# Altium PCB MainBoardPCB_PWR.PcbDoc (part 27 of 29)
Units mm, origin at the board's own origin, x right, y up, seen from the top; angles counter-clockwise.
Board outline 333.63 x 349.38 mm, 16 copper layers (L1, L2 (GND), L3 (Sign), L4 (GND), L5 (Sign), L6 (PWR/GND), L7(PWR/GND), L8 (PWR/GND), L9 (PWR/GND), L10 (PWR/GND), L11 (PWR/GND), L12 (Sign), L13 (GND), L14 (Sign), L15 (GND), L16), stack 2.503 mm thick; 2187 components, 1615 nets, 7987 pads, 1695 vias.
Unrouted connection lines stored in the file: 4757.
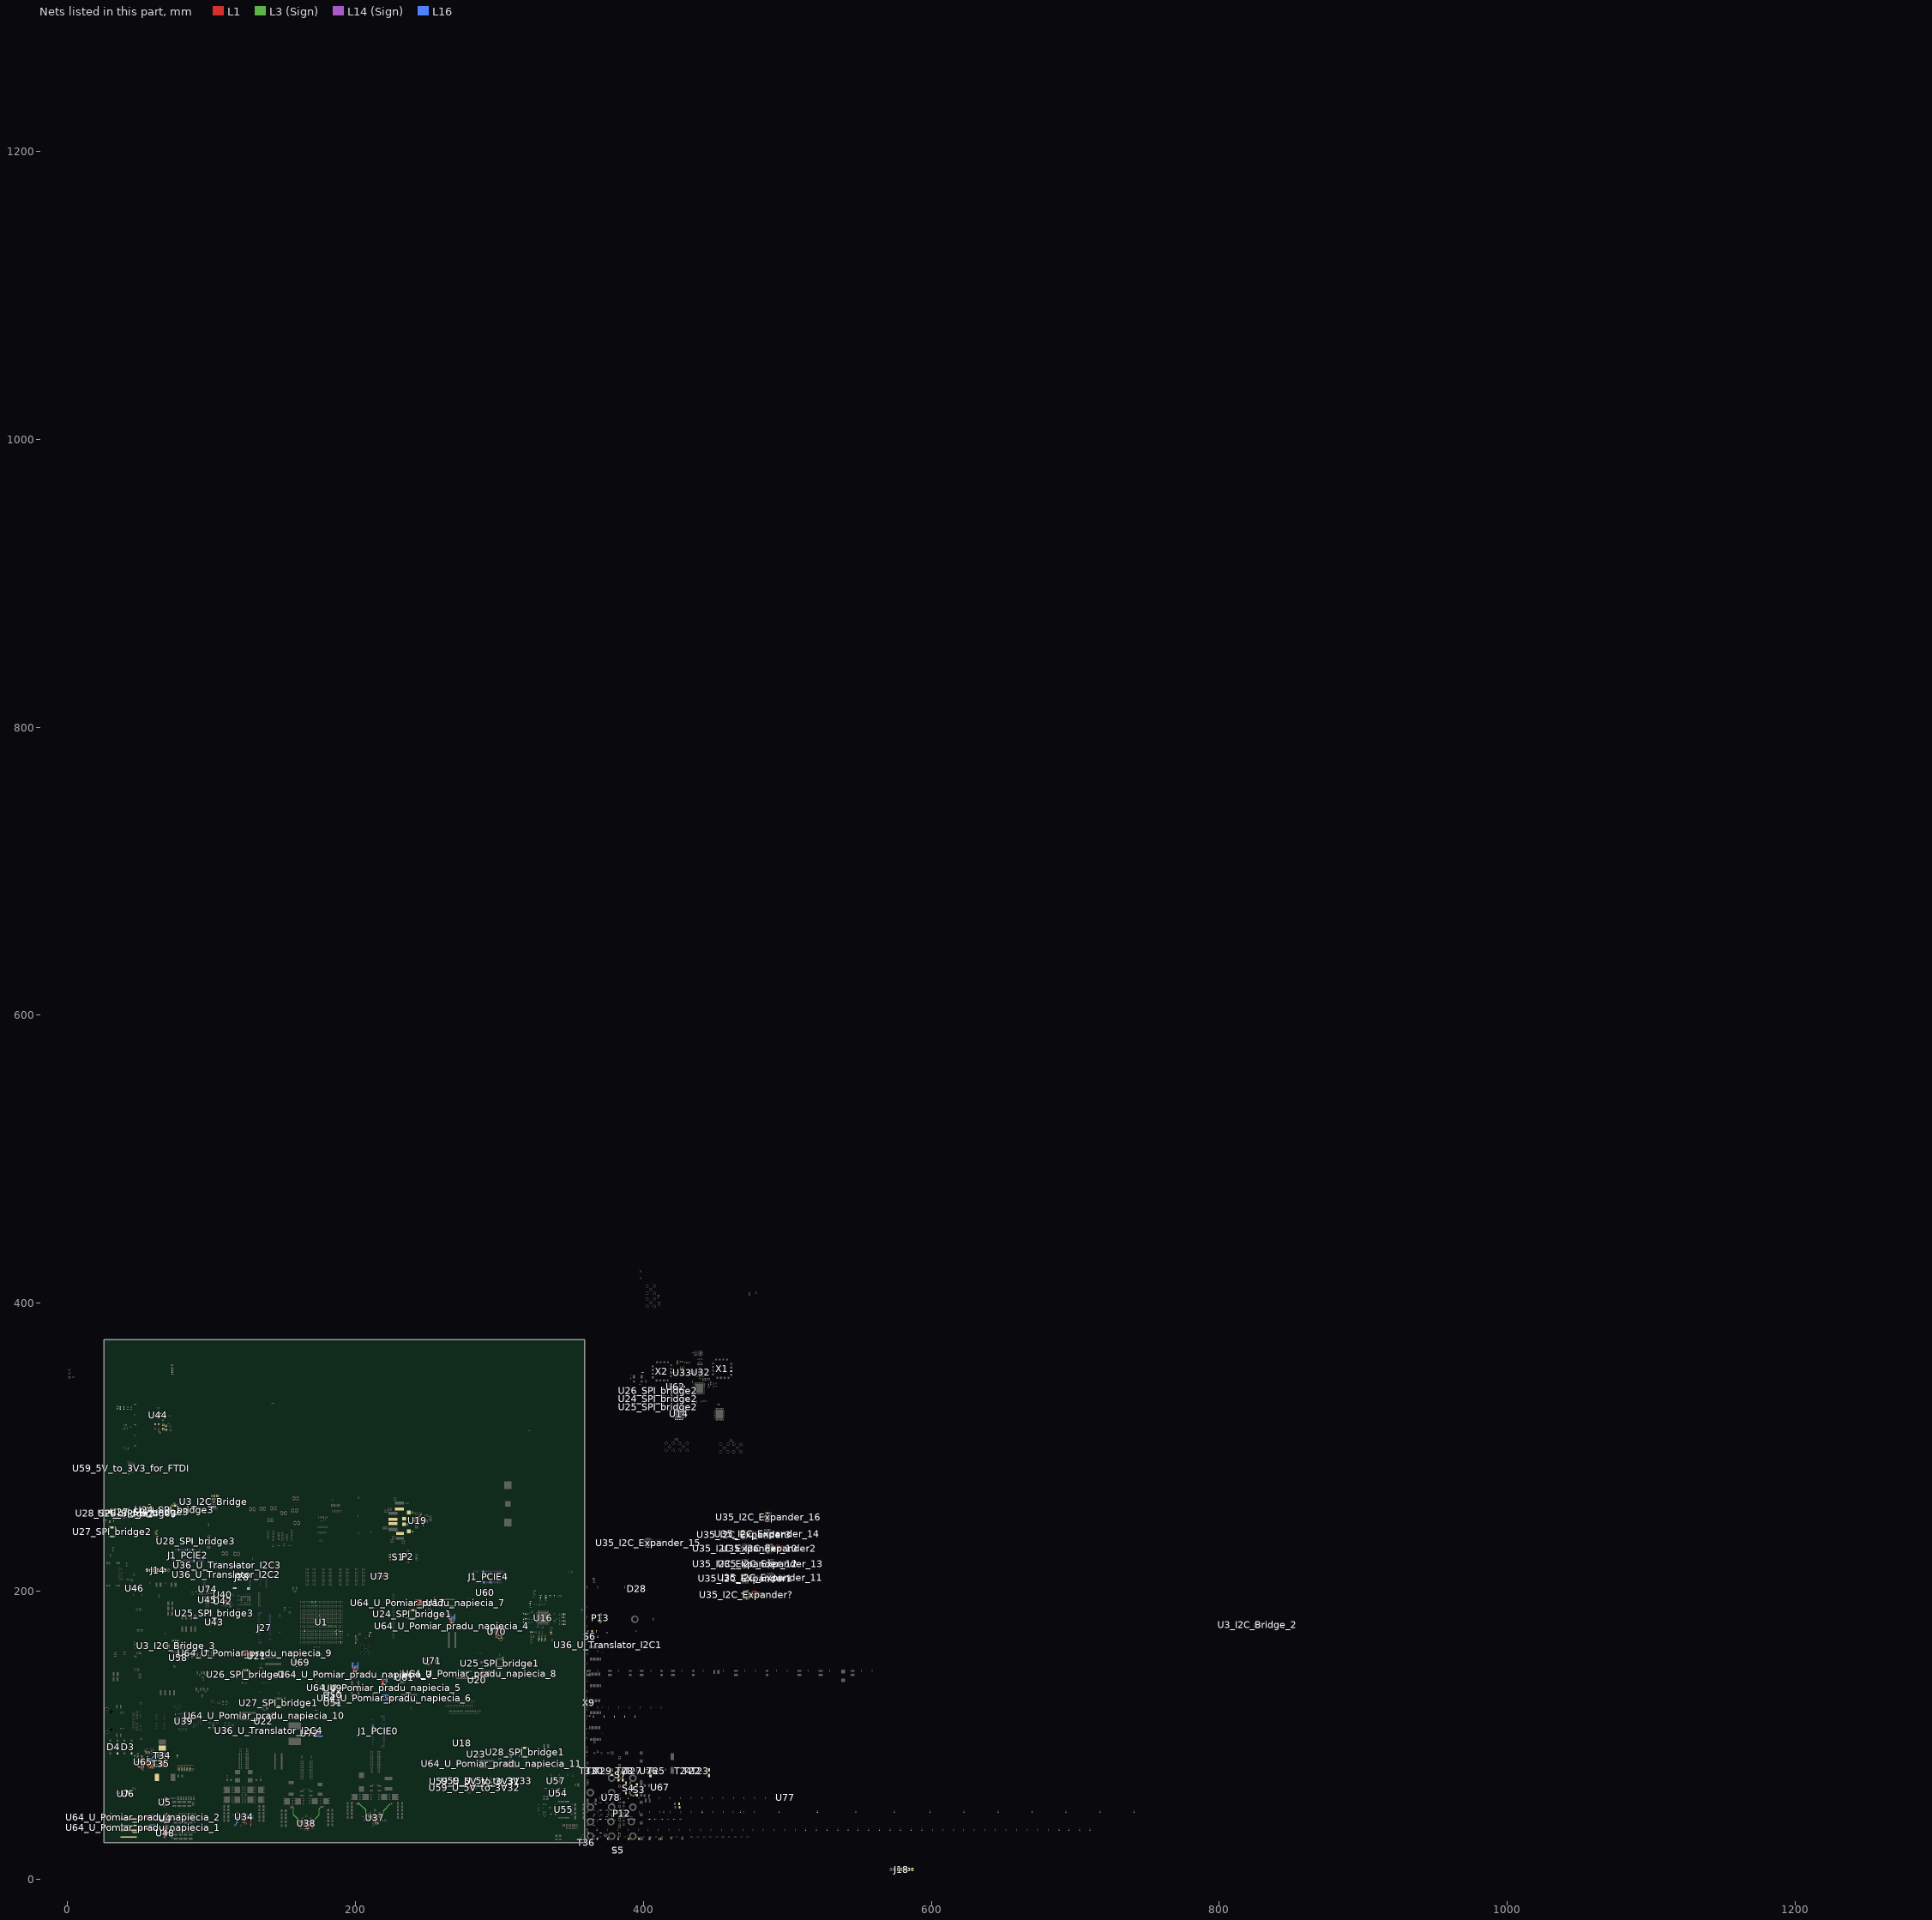
[diagram p22: the nets of this part, all layers, seen from the top]

## Via types
v1: diameter 0.5, hole 0.2, L1 to L16, 786 vias
v2: diameter 0.5/0.35/0.35/0.35/0.35/0.35/0.35/0.35/0.35/0.35/0.35/0.35/0.35/0.35/0.35/0.5 (per signal layer), hole 0.15, L1 to L16, tented both sides, 164 vias
v3: diameter 2.54, hole 1.02, L1 to L16, 152 vias
v4: diameter 0.5/0.35/0.35/0.35/0.35/0.35/0.35/0.35/0.35/0.35/0.35/0.35/0.35/0.35/0.35/0.5 (per signal layer), hole 0.2, L1 to L16, tented both sides, 100 vias
v5: diameter 0.45, hole 0.15, L1 to L16, 79 vias
v6: diameter 0.35/0/0.35 (per signal layer), hole 0.127, L1 to L3 (Sign), tented both sides, 78 vias
v7: diameter 0.45/0.45/0.45/0.45/0.45/0.45/0.45/0.45/0.45/0.45/0.45/0.45/0.45/0.45/0.45/0.45 (per signal layer), hole 0.15, L1 to L16, 65 vias
v8: diameter 0.4, hole 0.15, L1 to L16, 61 vias
v9: diameter 0.2, hole 0.1, L1 to L16, 35 vias
v10: diameter 0.5, hole 0.2, L1 to L16, tented both sides, 32 vias
v11: diameter 0.2/0/0.2 (per signal layer), hole 0.1, L1 to L3 (Sign), 28 vias
v12: diameter 0.4, hole 0.2, L1 to L16, 16 vias
v13: diameter 0.25, hole 0.2, L1 to L16, 16 vias
v14: diameter 0.3, hole 0.2, L1 to L16, 15 vias
v15: diameter 0.5/0.35/0.35/0.35/0.35/0.35/0.35/0.35/0.35/0.35/0.35/0.35/0.35/0.35/0.35/0.45 (per signal layer), hole 0.15, L1 to L16, tented both sides, 10 vias
v16: diameter 5, hole 3, L1 to L16, 9 vias
v17: diameter 0.2/0/0.2 (per signal layer), hole 0.1, L1 to L3 (Sign), tented both sides, 9 vias
v18: diameter 0.35/0/0.35 (per signal layer), hole 0.127, L1 to L3 (Sign), 7 vias
v19: diameter 0.35/0/0.35 (per signal layer), hole 0.127, L14 (Sign) to L16, tented both sides, 5 vias
v20: diameter 1.65, hole 1.65, L1 to L16, 4 vias
v21: diameter 1.15, hole 1.15, L1 to L16, 4 vias
v22: diameter 0.35, hole 0.127, L1 to L2 (GND), 2 vias
v23: diameter 0.4, hole 0.2, L1 to L16, tented both sides, 2 vias
v24: diameter 0.35, hole 0.127, L1 to L2 (GND), tented both sides, 2 vias
v25: diameter 0.508, hole 0.127, L1 to L2 (GND), 2 vias
v26: diameter 0.508, hole 0.127, L2 (GND) to L3 (Sign), 2 vias
v27: diameter 0.35, hole 0.127, L3 (Sign) to L6 (PWR/GND), tented both sides, 2 vias
v28: diameter 0.5, hole 0.2, L3 (Sign) to L6 (PWR/GND), tented both sides, 2 vias
v29: diameter 5.5, hole 3.5, L1 to L16, 1 vias
v30: diameter 0.45/0.45/0.45 (per signal layer), hole 0.15, L1 to L3 (Sign), 1 vias
v31: diameter 0.35/0.35/0.35 (per signal layer), hole 0.127, L1 to L3 (Sign), tented both sides, 1 vias
v32: diameter 0.45/0/0.45 (per signal layer), hole 0.15, L1 to L3 (Sign), tented both sides, 1 vias
v33: diameter 0.45/0/0.45 (per signal layer), hole 0.2, L14 (Sign) to L16, tented both sides, 1 vias
v34: diameter 0.35, hole 0.127, L2 (GND) to L3 (Sign), 1 vias

## Nets (pads, with @x,y where several pads share a name; then routed paths per layer and width w, separated by ;. In a path a pad name is that pad's centre, name@x,y a point inside that pad or via, vN(x,y) a via of type N, cw(c..) or ccw(c..) an arc to the next point about the centre after c; other vN are vias at no path point) (continued)
NetC657_1: C657.1 U51.6 | length 1.4
  L1 w0.254: U51.6@185.559,122.213 186.674,122.213 186.721,122.166 186.726,122.166 186.869,122.023 C657.1@186.869,122.018
NetC674_2: C674.2 FB45.1 R644.2 U69.10 U69.11 U69.12 U69.13 U69.14
NetC678_2: C678.2 R652.2 R654.2 T25.1 T29.3
NetC679_2: C679.2 D22.1 D23.1
NetC680_2: C680.2 R656.1 R657.1 T30.1
NetC693_1: C693.1 L22.1 T34.1 T34.2 T34.3 T35.5 U65.12 | length 8
  L1 w0.254: U65.12@54.172,80.707 55.15,80.707 55.518,80.339 55.518,78.52 56.907,77.13 C693.1@59.589,77.13
NetC693_2: C693.2 D26.1 R665.1 | length 2.8
  L1 w0.254: R665.1@58.578,77.884 58.591,77.897 59.576,77.897 C693.2@59.589,77.91 59.589,77.915 59.978,78.305 D26.1@59.978,79.555
NetC701_1: C701.1 R667.2 | length 1
  L1 w0.254: C701.1@49.964,77.884 49.966,77.882 R667.2@50.946,77.88 R667.2@50.946,77.88
NetC701_2: C701.2 C702.2 U65.5 | length 3.5
  L1 w0.254: C701.2@49.184,77.884 49.117,77.952 49.117,79.353 C702.2@49.049,79.42 49.054,79.42 49.197,79.563 49.197,79.568 49.233,79.604 49.233,79.82 49.619,80.207 U65.5@50.492,80.207
NetC703_2: C703.2 U65.7 | length 2.1
  L1 w0.254: U65.7@51.832,79.367 51.855,79.344 51.855,78.898 52.211,78.541 52.522,78.541 52.778,78.285 C703.2@52.778,77.832
NetC706_1: C706.1 R671.1 R672.2 U70.16 | length 3.4
  L1 w0.254: U70.16@299.259,173.698 R672.2@299.259,174.82 299.737,174.82 300.076,174.481 300.335,174.481 300.793,174.938 C706.1@300.793,175.397
NetC710_1: C710.1 R673.1 R674.2 U70.10 | length 5.3
  L1 w0.254: v11(299.253,169.141) 299.259,169.147 U70.10@299.259,169.748 ; v11(301.668,168.891) 301.618,168.891 301.445,168.718 301.445,168.532 301.313,168.4 C710.1@301.313,168.063 301.313,167.527 301.702,167.138 R674.2@301.752,167.138
  L3 (Sign) w0.254: v11(299.253,169.141) 301.417,169.141 v11(301.668,168.891)
NetC711_2: C711.2 U70.7 | length 1.6
  L1 w0.254: C711.2@297.752,168.193 297.756,168.196 297.756,169.745 U70.7@297.759,169.748
NetC712_2: C712.2 U70.19 | length 1.1
  L1 w0.254: C712.2@297.752,174.79 297.756,174.786 297.756,173.702 U70.19@297.759,173.698
NetC713_2: C713.2 U71.3 X1.14 | length 2.5
  L1 w0.254: 249.223,142.723 249.228,142.723 250.076,143.57 250.076,144.878
NetC719_2: C719.2 U69.7 | length 0.9
  L1 w0.254: U69.7@161.393,152.137 161.393,152.615 161.458,152.68 C719.2@161.458,153.027
NetC724_1: C724.1 R384.1
NetC725_1: C725.1 R385.1
NetC726_1: C726.1 R484.1
NetC727_1: C727.1 R485.1
NetC790_1: C790.1 U76.3
NetD5_1: D5.1 R716.1
NetD5_2: D5.2 U43.14
NetD6_1: D6.1 R717.1
NetD6_2: D6.2 U43.13
NetD7_1: D7.1 R718.1
NetD7_2: D7.2 D9.2 U43.12
NetD8_1: D8.1 R719.1
NetD8_2: D8.2 U43.11
NetD9_1: D9.1 R720.1
NetD10_1: D10.1 R368.1
NetD10_2: D10.2 U44.12
NetD11_2: D11.2 R370.1 S4.1 S4.2 U44.7
NetD12_2: D12.2 R369.1 S3.1 S3.2 U44.6
NetD16_1: D16.1 L13.1 U19.5
NetD16_2: D16.2 U19.6
NetD17_1: D17.1 L16.1 U19.4
NetD17_2: D17.2 U19.3
NetD18_1: D18.1 L17.1 U19.2
NetD18_2: D18.2 U19.1
NetD19_1: D19.1 L18.1 U19.7
NetD19_2: D19.2 U19.8
NetD20_1: D20.1 D21.1 R647.1
NetD20_2: D20.2 T23.3
NetD21_2: D21.2 T27.3
NetD28_2: D28.2 R276.2
NetFB29_2: FB29.2 J28.10 J28.11 J28.12 J28.13
NetJ30_1: R283.2
NetJ30_2: R286.2
NetL15_2: L15.2 U19.24 | length 3.1
  L1 w0.254: U19.24@243.724,251.458 243.724,251.925 243.873,252.074 244.901,252.074 245.449,252.622 L15.2@245.449,253.225
NetP3_1: P3.1 U44.11
NetP4_2: P4.2 U44.10
NetP12_13: P12.13 R730.1 U78.1
NetP13_1: P13.1 R675.2
NetP13_3: P13.3 R737.1
NetR3_I2C_Bridge_1: R3_I2C_Bridge.1 U3_I2C_Bridge.17
NetR3_I2C_Bridge_2_1: R3_I2C_Bridge_2.1 U3_I2C_Bridge_2.17
NetR3_I2C_Bridge_3_1: R3_I2C_Bridge_3.1 R176.1 R180.1 R185.1 R189.1 R194.1 R198.1 R203.1 R207.1 R213.1 R221.1 R538.1 U3_I2C_Bridge.19 U3_I2C_Bridge_3.17 U58.13 U64_U_Pomiar_pradu_napiecia_7.5 U64_U_Pomiar_pradu_napiecia_8.5 U64_U_Pomiar_pradu_napiecia_9.5 U64_U_Pomiar_pradu_napiecia_10.5 U64_U_Pomiar_pradu_napiecia_11.5 | length 23.6
  L1 w0.254: v8(124.91,156.531) R198.1@124.91,157.663 ; v8(126.79,155.981) 126.83,155.981 126.887,156.039 U64_U_Pomiar_pradu_napiecia_9.5@127.94,156.039 ; U64_U_Pomiar_pradu_napiecia_10.5@138.938,114.546 v8(140.288,114.546) ; R207.1@142.088,113.018 v8(142.088,114.152) ; v8(245.03,191.282) R180.1@245.03,192.759 ; v8(246.769,190.832) 246.771,190.831 U64_U_Pomiar_pradu_napiecia_7.5@248.09,190.829 U64_U_Pomiar_pradu_napiecia_7.5@248.09,190.829 ; U64_U_Pomiar_pradu_napiecia_8.5@288.331,143.579 v8(289.281,143.579) ; R189.1@291.357,141.943 R185.1@291.357,143.229 v8(291.357,143.379) ; U64_U_Pomiar_pradu_napiecia_11.5@303.702,80.993 v8(304.965,80.993) ; R221.1@307.166,78.891 v8(307.166,80.768)
  L16 w0.254: v8(124.91,156.531) 125.46,155.981 v8(126.79,155.981) ; v8(140.288,114.546) 141.694,114.546 v8(142.088,114.152) ; v8(245.03,191.282) 245.48,190.832 v8(246.769,190.832) ; v8(289.281,143.579) 289.481,143.379 v8(291.357,143.379) ; v8(304.965,80.993) 305.005,80.993 305.23,80.768 v8(307.166,80.768)
NetR4_I2C_Bridge_1: R4_I2C_Bridge.1 U3_I2C_Bridge.16
NetR4_I2C_Bridge_2_1: R4_I2C_Bridge_2.1 U3_I2C_Bridge_2.16
NetR4_I2C_Bridge_3_1: R4_I2C_Bridge_3.1 R177.1 R181.1 R186.1 R190.1 R195.1 R199.1 R204.1 R208.1 R215.1 R222.1 R427.1 U3_I2C_Bridge.20 U3_I2C_Bridge_3.16 U58.14 U64_U_Pomiar_pradu_napiecia_7.4 U64_U_Pomiar_pradu_napiecia_8.4 U64_U_Pomiar_pradu_napiecia_9.4 U64_U_Pomiar_pradu_napiecia_10.4 U64_U_Pomiar_pradu_napiecia_11.4 | length 30.3
  L1 w0.254: R195.1@123.852,156.531 v8(123.852,157.663) ; v8(126.79,156.656) 126.83,156.656 126.947,156.539 U64_U_Pomiar_pradu_napiecia_9.4@127.94,156.539 ; U64_U_Pomiar_pradu_napiecia_10.4@138.938,114.046 v8(139.888,114.046) ; R208.1@143.053,113.018 v8(143.053,113.143) R204.1@143.053,114.282 ; R177.1@244.014,191.282 v8(244.014,192.709) R181.1@244.014,192.759 ; v8(246.769,191.479) 246.809,191.479 246.959,191.329 U64_U_Pomiar_pradu_napiecia_7.4@248.09,191.329 ; U64_U_Pomiar_pradu_napiecia_8.4@288.331,143.079 288.354,143.056 289.114,143.056 289.241,142.929 v8(289.281,142.929) ; v8(292.357,142.068) R186.1@292.357,143.229 ; U64_U_Pomiar_pradu_napiecia_11.4@303.702,80.493 304.671,80.493 304.821,80.343 v8(304.86,80.343) ; R222.1@308.227,78.891 R215.1@308.227,80.768
  L16 w0.254: v8(123.852,157.663) 125.783,157.663 v8(126.79,156.656) ; v8(139.888,114.046) 140.791,113.143 v8(143.053,113.143) ; v8(244.014,192.709) 245.539,192.709 v8(246.769,191.479) ; v8(289.281,142.929) 290.142,142.068 v8(292.357,142.068) ; v8(304.86,80.343) 306.462,78.741 v8(308.227,78.741)
NetR5_I2C_Bridge_1: R5_I2C_Bridge.1 U3_I2C_Bridge.15
NetR5_I2C_Bridge_2_1: R5_I2C_Bridge_2.1 U3_I2C_Bridge_2.15
NetR5_I2C_Bridge_3_1: R5_I2C_Bridge_3.1 U3_I2C_Bridge_3.15 U35_I2C_Expander3.8
NetR6_I2C_Bridge_1: R6_I2C_Bridge.1 U3_I2C_Bridge.14
NetR6_I2C_Bridge_2_1: R6_I2C_Bridge_2.1 U3_I2C_Bridge_2.14
NetR6_I2C_Bridge_3_1: R6_I2C_Bridge_3.1 U3_I2C_Bridge_3.14 U35_I2C_Expander3.9
NetR7_I2C_Bridge_1: R7_I2C_Bridge.1 U3_I2C_Bridge.13
NetR7_I2C_Bridge_2_1: R7_I2C_Bridge_2.1 U3_I2C_Bridge_2.13
NetR7_I2C_Bridge_3_1: R7_I2C_Bridge_3.1 R130.1 U3_I2C_Bridge_3.13
NetR8_I2C_Bridge_1: R8_I2C_Bridge.1 U3_I2C_Bridge.12
NetR8_I2C_Bridge_2_1: R8_I2C_Bridge_2.1 U3_I2C_Bridge_2.12
NetR8_I2C_Bridge_3_1: R8_I2C_Bridge_3.1 R131.1 U3_I2C_Bridge_3.12
NetR9_I2C_Bridge_2_1: R9_I2C_Bridge_2.1 U3_I2C_Bridge_2.11
NetR9_I2C_Bridge_3_1: R9_I2C_Bridge_3.1 R22.1 R389.1 R457.1 R465.1 R563.1 R567.1 R571.1 R575.1 R579.1 R583.1 R587.1 R591.1 R593.1 R597.1 U3_I2C_Bridge_3.11 U35_I2C_Expander1.8 U35_I2C_Expander2.8 U64_U_Pomiar_pradu_napiecia_1.5 U64_U_Pomiar_pradu_napiecia_2.5 U64_U_Pomiar_pradu_napiecia_3.5 U64_U_Pomiar_pradu_napiecia_4.5 U64_U_Pomiar_pradu_napiecia_5.5 U64_U_Pomiar_pradu_napiecia_6.5 U72.5 | length 39.6
  L1 w0.164: U64_U_Pomiar_pradu_napiecia_5.5@218.753,135.604 218.753,138.01 219.352,138.609 v4(219.352,138.865)
  L1 w0.254: U64_U_Pomiar_pradu_napiecia_1.5@54.676,36.768 58.159,36.768 58.299,36.628 v8(58.339,36.628) ; U64_U_Pomiar_pradu_napiecia_2.5@54.676,43.783 58.174,43.783 58.299,43.658 v8(58.339,43.658) ; U72.5@170.431,102.245 174.133,102.245 v8(174.687,101.691) ; U64_U_Pomiar_pradu_napiecia_3.5@198.796,144.262 198.796,147.009 199.036,147.249 v8@199.036,148.149 ; v8(220.909,125.43) 221.634,124.705 U64_U_Pomiar_pradu_napiecia_6.5@224.78,124.705 ; U64_U_Pomiar_pradu_napiecia_4.5@266.005,178.019 266.005,180.621 266.43,181.046 v8(266.43,181.846)
  L16 w0.254: R465.1@58.339,35.163 v8(58.339,36.628) ; R597.1@58.339,41.9 v8(58.339,43.658) ; R389.1@174.687,100.145 v8(174.687,101.691) ; R563.1@199.036,148.149 R567.1@200.961,148.149 ; R579.1@219.302,138.865 v4(219.352,138.865) R583.1@221.209,138.865 ; R587.1@220.909,125.305 v8(220.909,125.43) R591.1@220.909,126.878 ; R571.1@266.305,181.846 v8(266.43,181.846) R575.1@268.155,181.846
  other v8: 198.919,148.246
NetR10_I2C_Bridge_2_1: R10_I2C_Bridge_2.1 U3_I2C_Bridge_2.10
NetR10_I2C_Bridge_3_1: R10_I2C_Bridge_3.1 R24.1 R390.1 R459.1 R466.1 R564.1 R568.1 R572.1 R576.1 R580.1 R584.1 R588.1 R592.1 R594.1 R598.1 U3_I2C_Bridge_3.10 U35_I2C_Expander1.9 U35_I2C_Expander2.9 U64_U_Pomiar_pradu_napiecia_1.4 U64_U_Pomiar_pradu_napiecia_2.4 U64_U_Pomiar_pradu_napiecia_3.4 U64_U_Pomiar_pradu_napiecia_4.4 U64_U_Pomiar_pradu_napiecia_5.4 U64_U_Pomiar_pradu_napiecia_6.4 U72.4 | length 37.1
  L1 w0.164: U64_U_Pomiar_pradu_napiecia_5.4@219.253,135.17 219.253,136.543 219.253,136.977 219.935,137.658 v4(221.147,137.658)
  L1 w0.254: U64_U_Pomiar_pradu_napiecia_1.4@54.676,36.267 56.193,36.267 v8(57.298,35.163) ; U64_U_Pomiar_pradu_napiecia_2.4@54.676,43.283 55.881,43.283 v8(57.264,41.9) ; U72.4@170.431,101.745 172.074,101.745 v8(173.68,100.139) ; U64_U_Pomiar_pradu_napiecia_3.4@199.296,144.262 199.296,145.539 200.961,147.204 v8(200.961,147.226) ; v8(221.959,126.883) 223.637,125.205 U64_U_Pomiar_pradu_napiecia_6.4@224.78,125.205 ; U64_U_Pomiar_pradu_napiecia_4.4@266.505,178.019 266.505,179.256 v8(268.151,180.903)
  L16 w0.254: v8(57.264,41.9) R594.1@57.264,43.654 ; v8(57.298,35.163) R459.1@57.298,36.628 ; v8(173.68,100.139) R24.1@173.68,101.691 ; R564.1@198.911,147.2 198.937,147.226 v8(200.961,147.226) R568.1@200.961,147.2 ; R580.1@219.302,137.658 v4(221.147,137.658) R584.1@221.197,137.658 ; R588.1@221.959,125.305 v8(221.959,126.883) ; R572.1@266.305,180.907 266.309,180.903 v8(268.151,180.903) R576.1@268.155,180.907
NetR12_1: R12.1 R19.2 U5.5 | length 2
  L1 w0.254: R12.1@66.449,55.624 66.474,55.649 67.389,55.649 67.487,55.649 R19.2@67.512,55.674 ; U5.5@67.379,54.595 67.379,55.169 67.389,55.179 R19.2@67.389,55.551
NetR14_2: R14.2 R16.2 R22.2 R24.2 U72.2 | length 7.1
  L1 w0.254: U72.2@170.431,100.745 171.376,100.745 171.593,100.963 v8(171.633,100.963)
  L16 w0.254: v8(171.633,100.963) 173.261,102.591 R24.2@173.68,102.591 R16.2@176.728,102.591
NetR15_1: R15.1 R23.2 U4.5 | length 2.2
  L1 w0.254: R15.1@66.63,44.35 66.652,44.371 67.539,44.371 R23.2@67.56,44.393 U4.5@67.56,43.15
NetR17_1: R17.1 R25.2 U4.4 | length 2.8
  L1 w0.254: U4.4@68.06,43.15 68.06,43.628 68.087,43.655 68.087,44.088 68.693,44.693 R17.1@68.743,44.693 R25.2@68.743,45.643
NetR18_2: R18.2 U4.10 | length 1.4
  L1 w0.254: U4.10@67.56,40.85 67.587,40.823 67.587,40.602 67.96,40.229 R18.2@67.96,39.6
NetR20_1: R20.1 R26.2 U5.4 | length 2.2
  L1 w0.254: U5.4@67.879,54.595 67.906,54.622 67.906,54.99 68.512,55.595 R20.1@68.562,55.595 R26.2@68.562,56.524
NetR21_2: R21.2 U5.10 | length 1.1
  L1 w0.254: U5.10@67.412,52.049 67.412,52.042 67.815,51.639 67.815,51.151 R21.2@67.854,51.111
NetR27_2: R27.2 U6.C1
NetR28_2: R28.2 U7.C1
NetR149_1: R149.1 R159.2 U65.20 | length 3
  L1 w0.254: U65.20@51.332,83.047 51.332,84.377 51.732,84.777 R149.1@51.782,84.777 51.769,84.79 51.769,85.774 R159.2@51.757,85.787
NetR150_1: R150.1 R160.2 U65.6 | length 3.8
  L1 w0.254: U65.6@51.332,79.367 51.332,78.482 51.883,77.93 v9(51.883,77.905) ; v9(51.832,75.895) R150.1@51.882,75.895
  L16 w0.254: v9(51.832,75.895) 51.832,77.854 v9(51.883,77.905)
NetR174_2: R174.2 R175.2 R176.2 R177.2 U64_U_Pomiar_pradu_napiecia_7.2 | length 7.4
  L1 w0.254: R175.2@241.934,190.382 R176.2@245.03,190.382 245.604,190.382 246.154,190.932 246.154,191.715 246.769,192.329 U64_U_Pomiar_pradu_napiecia_7.2@248.09,192.329
NetR178_2: R178.2 R179.2 R180.2 R181.2 U64_U_Pomiar_pradu_napiecia_7.1 | length 6.5
  L1 w0.254: R179.2@241.934,193.659 R178.2@242.95,193.659 R181.2@244.014,193.659 R180.2@245.03,193.659 246.154,193.659 246.984,192.829 U64_U_Pomiar_pradu_napiecia_7.1@248.09,192.829
NetR182_2: R182.2 U17.C1
NetR183_2: R183.2 R184.2 R185.2 R186.2 U64_U_Pomiar_pradu_napiecia_8.2 | length 7.8
  L1 w0.254: U64_U_Pomiar_pradu_napiecia_8.2@288.331,142.079 289.636,142.079 290.021,142.464 290.021,143.98 290.17,144.129 R184.2@294.357,144.129
NetR187_2: R187.2 R188.2 R189.2 R190.2 U64_U_Pomiar_pradu_napiecia_8.1 | length 6.2
  L1 w0.254: U64_U_Pomiar_pradu_napiecia_8.1@288.331,141.579 289.636,141.579 290.172,141.043 R189.2@291.357,141.043 R188.2@294.357,141.043
NetR191_2: R191.2 U20.C1
NetR192_2: R192.2 R193.2 R194.2 R195.2 U64_U_Pomiar_pradu_napiecia_9.2 | length 7.5
  L1 w0.254: R193.2@121.735,155.631 R192.2@122.794,155.631 R195.2@123.852,155.631 R194.2@124.91,155.631 124.973,155.694 125.839,155.694 126.363,156.219 126.363,156.998 126.904,157.539 U64_U_Pomiar_pradu_napiecia_9.2@127.94,157.539
NetR196_2: R196.2 R197.2 R198.2 R199.2 U64_U_Pomiar_pradu_napiecia_9.1 | length 6.4
  L1 w0.254: R197.2@121.735,158.563 R196.2@122.794,158.563 R199.2@123.852,158.563 R198.2@124.91,158.563 125.839,158.563 126.363,158.039 U64_U_Pomiar_pradu_napiecia_9.1@127.94,158.039
NetR200_2: R200.2 U21.C1
NetR201_2: R201.2 R202.2 R203.2 R204.2 U64_U_Pomiar_pradu_napiecia_10.2 | length 6.9
  L1 w0.254: U64_U_Pomiar_pradu_napiecia_10.2@138.938,113.046 139.841,113.046 141.749,114.954 141.915,114.954 142.088,115.127 R203.2@142.088,115.177 R201.2@144.008,115.177 R202.2@144.958,115.177
NetR205_2: R205.2 R206.2 R207.2 R208.2 U64_U_Pomiar_pradu_napiecia_10.1 | length 6.2
  L1 w0.254: U64_U_Pomiar_pradu_napiecia_10.1@138.938,112.546 140.288,112.546 140.716,112.118 R207.2@142.088,112.118 R208.2@143.053,112.118 144.955,112.118 R206.2@144.958,112.121
NetR209_2: R209.2 U22.C1
NetR210_2: R210.2 R211.2 R213.2 R215.2 U64_U_Pomiar_pradu_napiecia_11.2 | length 8.3
  L1 w0.254: U64_U_Pomiar_pradu_napiecia_11.2@303.702,79.493 305.13,79.493 305.66,80.023 305.66,81.318 306.01,81.668 R213.2@307.166,81.668 R211.2@310.314,81.668
NetR217_2: R217.2 R219.2 R221.2 R222.2 U64_U_Pomiar_pradu_napiecia_11.1 | length 7
  L1 w0.254: U64_U_Pomiar_pradu_napiecia_11.1@303.702,78.993 305.078,78.993 306.08,77.991 R221.2@307.166,77.991 307.168,77.989 310.312,77.989 R219.2@310.314,77.987
NetR223_I2C_Bridge_2_1: R223_I2C_Bridge_2.1 U3_I2C_Bridge_2.8
NetR224_I2C_Bridge_2_1: R224_I2C_Bridge_2.1 U3_I2C_Bridge_2.7
NetR225_I2C_Bridge_2_1: R225_I2C_Bridge_2.1 U3_I2C_Bridge_2.6
NetR226_I2C_Bridge_2_1: R226_I2C_Bridge_2.1 U3_I2C_Bridge_2.5
NetR227_I2C_Bridge_2_1: R227_I2C_Bridge_2.1 U3_I2C_Bridge_2.4 U35_I2C_Expander_14.8 U35_I2C_Expander_15.8 U35_I2C_Expander_16.8
NetR228_2: R228.2 U23.C1
NetR229_2: R229.2 R230.2 R457.2 R459.2 U64_U_Pomiar_pradu_napiecia_1.2 | length 7.4
  L1 w0.254: U64_U_Pomiar_pradu_napiecia_1.2@54.676,35.267 55.618,35.267 55.833,35.483 v8(55.873,35.483)
  L16 w0.254: v8(55.873,35.483) 55.873,36.667 56.733,37.528 R459.2@57.298,37.528 R230.2@60.465,37.528
NetR231_SPI_bridge3_1: R231_SPI_bridge3.1 U24_SPI_bridge3.11
NetR231_SPI_bridge3_2: R231_SPI_bridge3.2 U24_SPI_bridge3.15
NetR232_SPI_bridge1_2: R232_SPI_bridge1.2 U24_SPI_bridge1.9
NetR232_SPI_bridge2_2: R232_SPI_bridge2.2 U24_SPI_bridge2.9
NetR232_SPI_bridge3_2: R232_SPI_bridge3.2 U24_SPI_bridge3.9
NetR233_SPI_bridge3_1: R233_SPI_bridge3.1 U24_SPI_bridge1.6 U25_SPI_bridge1.6 U25_SPI_bridge3.11 U26_SPI_bridge1.6 U27_SPI_bridge1.6 U28_SPI_bridge1.6
NetR234_SPI_bridge1_2: R234_SPI_bridge1.2 U25_SPI_bridge1.9
NetR234_SPI_bridge2_2: R234_SPI_bridge2.2 U25_SPI_bridge2.9
NetR234_SPI_bridge3_2: R234_SPI_bridge3.2 U25_SPI_bridge3.9
NetR235_SPI_bridge1_1: R235_SPI_bridge1.1 U26_SPI_bridge1.9
NetR235_SPI_bridge2_1: R235_SPI_bridge2.1 U26_SPI_bridge2.9
NetR235_SPI_bridge3_1: R235_SPI_bridge3.1 U26_SPI_bridge3.9
NetR237_SPI_bridge1_1: R237_SPI_bridge1.1 U27_SPI_bridge1.9
NetR237_SPI_bridge2_1: R237_SPI_bridge2.1 U27_SPI_bridge2.9
NetR237_SPI_bridge3_1: R237_SPI_bridge3.1 U27_SPI_bridge3.9
NetR238_SPI_bridge2_1: R238_SPI_bridge2.1 U27_SPI_bridge2.11
NetR238_SPI_bridge2_2: R238_SPI_bridge2.2 U27_SPI_bridge2.15
NetR238_SPI_bridge3_1: R238_SPI_bridge3.1 U27_SPI_bridge3.11
NetR238_SPI_bridge3_2: R238_SPI_bridge3.2 U27_SPI_bridge3.15
NetR239_SPI_bridge1_2: R239_SPI_bridge1.2 U28_SPI_bridge1.9
NetR239_SPI_bridge2_2: R239_SPI_bridge2.2 U28_SPI_bridge2.9
NetR239_SPI_bridge3_2: R239_SPI_bridge3.2 U28_SPI_bridge3.9
NetR240_SPI_bridge3_1: R240_SPI_bridge3.1 U28_SPI_bridge3.11
NetR240_SPI_bridge3_2: R240_SPI_bridge3.2 U28_SPI_bridge3.15
NetR241_1: R241.1 R242.1 U3_I2C_Bridge_2.22
NetR243_1: R243.1 R244.1 U3_I2C_Bridge_2.23
NetR263_2: R263.2 U33.16
NetR264_2: R264.2 U33.13
NetR265_2: R265.2 U33.15
NetR266_1: R266.1 R267.2 S5.1 S5.2 S5.3 S5.4
NetR269_2: R269.2 U18.C1
NetR272_1: R272.1 U34.5 | length 1.8
  L1 w0.254: R272.1@122.978,39.14 U34.5@122.977,40.906
NetR281_1: R281.1 R400.1 U3_I2C_Bridge_2.18
NetR284_2: R284.2 U19.17
NetR289_1: R289.1 U37.5 | length 1.4
  L1 w0.254: R289.1@213.795,38.966 U37.5@213.795,40.359
NetR293_2: R293.2 R294.2 U37.7 | length 2.4
  L1 w0.254: U37.7@214.795,40.359 R293.2@214.795,38.966 R294.2@215.795,38.966
NetR304_2: R304.2 R388.2 R389.2 R390.2 U72.1 | length 6.7
  L1 w0.254: U72.1@170.431,100.245 171.487,100.245 171.593,100.139 v8(171.633,100.139)
  L16 w0.254: v8(171.633,100.139) 172.533,99.239 R388.2@176.728,99.239
NetR305_2: R305.2 U67.6
NetR307_1: R307.1 U38.5 | length 1.8
  L1 w0.254: R307.1@165.608,34.987 165.608,35.037 166.283,35.712 U38.5@166.283,36.515
NetR308_2: R308.2 U67.5
NetR309_2: R309.2 U67.4
NetR310_2: R310.2 R312.2 U38.7 | length 2.5
  L1 w0.254: R310.2@166.533,34.987 R312.2@167.448,34.987 167.448,35.745 167.283,35.91 U38.7@167.283,36.515
NetR334_1: R334.1 U39.12
NetR339_1: R339.1 R341.2 U40.7 | length 2.6
  L1 w0.164: U40.7@109.116,197.66 R339.1@110.692,197.66 R341.2@110.692,196.635
NetR342_1: R342.1 R344.2 U42.7 | length 2.3
  L1 w0.164: U42.7@109.117,193.373 109.242,193.373 109.336,193.279 R342.1@110.39,193.279 ; R344.2@110.39,192.073 110.392,192.075 R342.1@110.392,193.102
NetR358_1: R358.1 S1.8
NetR359_1: R359.1 S1.7
NetR360_1: R360.1 S1.6
NetR361_1: R361.1 S1.5
NetR366_2: R366.2 R498.1 R499.2 R692.2
NetR372_1: R372.1 R373.2 U44.2 U44.3
NetR379_2: R379.2 U45.24
NetR380_2: R380.2 U46.C1
NetR391_1: R391.1 R393.2 U49.7 | length 3.5
  L1 w0.254: U49.7@185.559,132.959 187.374,132.959 187.523,132.811 187.523,132.618 R393.2@187.696,132.445 187.721,132.47 188.7,132.47 R391.1@188.725,132.495
NetR394_1: R394.1 R396.2 U50.7 | length 3.8
  L1 w0.254: U50.7@185.559,128.11 185.607,128.158 188.126,128.158 R394.1@188.22,128.252 R396.2@188.22,127.169
NetR397_1: R397.1 R399.2 U51.7 | length 3.9
  L1 w0.254: U51.7@185.559,122.863 186.314,122.863 186.575,123.125 R397.1@188.266,123.125 R399.2@188.266,122.059
NetR419_2: R419.2 R422.1 U54.1
NetR423_2: R423.2 U55.6
NetR424_2: R424.2 U55.14
NetR428_1: R428.1 U3_I2C_Bridge_2.20 U35_I2C_Expander?.9 U36_U_Translator_I2C1.5 U36_U_Translator_I2C2.5
NetR429_1: R429.1 U58.12
NetR430_5V_to_3V3_for_FTDI_1: R430_5V_to_3V3_for_FTDI.1 R432_5V_to_3V3_for_FTDI.2 U59_5V_to_3V3_for_FTDI.7 | length 2.8
  L1 w0.254: U59_5V_to_3V3_for_FTDI.7@43.751,286.64 43.751,287.194 44.222,287.665 R432_5V_to_3V3_for_FTDI.2@44.222,288.192 R430_5V_to_3V3_for_FTDI.1@45.226,288.192
NetR430_U_5V_to_3V31_1: R430_U_5V_to_3V31.1 R432_U_5V_to_3V31.2 U59_U_5V_to_3V31.7 | length 1.5
  L1 w0.254: R430_U_5V_to_3V31.1@280.294,67.459 280.962,67.459 281.162,67.659 U59_U_5V_to_3V31.7@281.697,67.659
NetR430_U_5V_to_3V32_1: R430_U_5V_to_3V32.1 R432_U_5V_to_3V32.2 U59_U_5V_to_3V32.7 | length 3.7
  L1 w0.254: R432_U_5V_to_3V32.2@278.529,64.209 279.936,64.209 280.386,63.759 R430_U_5V_to_3V32.1@280.386,63.209 U59_U_5V_to_3V32.7@281.454,63.209
NetR430_U_5V_to_3V33_1: R430_U_5V_to_3V33.1 R432_U_5V_to_3V33.2 U59_U_5V_to_3V33.7 | length 4.5
  L1 w0.254: U59_U_5V_to_3V33.7@292.231,68.634 292.712,68.634 v11(292.766,68.581) ; R432_U_5V_to_3V33.2@294.81,65.516 v11(294.81,66.603)
  L3 (Sign) w0.254: v11(292.766,68.581) 294.743,66.603 v11(294.81,66.603)
NetR431_5V_to_3V3_for_FTDI_1: R431_5V_to_3V3_for_FTDI.1 U59_5V_to_3V3_for_FTDI.5 | length 2.1
  L1 w0.254: U59_5V_to_3V3_for_FTDI.5@45.051,286.64 45.051,286.765 46.094,287.808 46.094,288.019 R431_5V_to_3V3_for_FTDI.1@46.267,288.192
NetR433_1: R433.1 R434.2 U60.9 | length 2.5
  L1 w0.254: U60.9@291.715,198.056 291.865,198.056 292.369,197.553 R434.2@292.935,197.553 R433.1@292.935,198.582
NetR435_1: R435.1 R668.2 U69.4
NetR443_1: R443.1 R444.2 U62.6 | length 5.8
  L1 w0.254: U62.6@423.755,340.842 v9(424.26,340.842) ; v9(427.76,340.542) 427.76,340.592 428.187,341.019 428.187,341.594 R443.1@428.535,341.942
  L16 w0.254: v9(424.26,340.842) 427.46,340.842 v9(427.76,340.542)
NetR449_1: R449.1 R450.1 U3_I2C_Bridge.22
NetR451_1: R451.1 R452.1 U3_I2C_Bridge.23
NetR453_1: R453.1 R454.1 U3_I2C_Bridge.18
NetR455_1: R455.1 R456.1 U35_I2C_Expander1.13 | length 6.7
  L1 w0.254: U35_I2C_Expander1.13@473.761,210.017 474.528,210.017 475.728,211.217 477.016,211.217 477.272,210.961 R455.1@477.272,210.411 R456.1@479.304,210.411
NetR458_1: R458.1 R460.1 U35_I2C_Expander1.12 | length 6.6
  L1 w0.254: U35_I2C_Expander1.12@473.761,209.367 v1(475.297,209.367) ; R458.1@477.272,209.367 v1(478.31,209.367) R460.1@479.304,209.367
  L14 (Sign) w0.254: v1(475.297,209.367) v1(478.31,209.367)
NetR461_2: R461.2 R463.2 R465.2 R466.2 U64_U_Pomiar_pradu_napiecia_1.1 | length 6
  L1 w0.254: U64_U_Pomiar_pradu_napiecia_1.1@54.676,34.768 55.733,34.768 55.833,34.667 v8(55.873,34.667)
  L16 w0.254: v8(55.873,34.667) 56.277,34.263 R466.2@57.298,34.263 57.303,34.268 60.46,34.268 R463.2@60.465,34.274
NetR462_1: R462.1 R464.1 U35_I2C_Expander1.11 | length 6.5
  L1 w0.254: U35_I2C_Expander1.11@473.761,208.717 474.663,208.717 475.728,207.651 476.979,207.651 477.272,207.945 R462.1@477.272,208.345 R464.1@479.304,208.345
NetR467_2: R467.2 R468.2 R593.2 R594.2 U64_U_Pomiar_pradu_napiecia_2.2 | length 7.6
  L1 w0.254: U64_U_Pomiar_pradu_napiecia_2.2@54.676,42.283 55.722,42.283 55.833,42.394 v8(55.873,42.394)
  L16 w0.254: v8(55.873,42.394) 55.873,43.683 56.733,44.543 57.254,44.543 R594.2@57.264,44.554 57.268,44.557 60.527,44.557 R468.2@60.53,44.561
NetR469_1: R469.1 R470.1 U3_I2C_Bridge_3.22
NetR471_1: R471.1 R472.1 U3_I2C_Bridge_3.23
NetR473_1: R473.1 R474.1 U3_I2C_Bridge_3.18
NetR475_1: R475.1 R476.1 U35_I2C_Expander3.13 | length 6.5
  L1 w0.254: 472.72,239.27 473.363,239.27 474.513,238.12 475.937,238.12 476.234,238.416 476.234,238.839 R475.1@476.289,238.894 ; R475.1@476.261,238.866 478.066,238.866 R476.1@478.101,238.902
NetR477_1: R477.1 R478.1 U35_I2C_Expander3.12 | length 6.7
  L1 w0.254: U35_I2C_Expander3.12@472.72,239.92 472.726,239.925 v1(474.17,239.925) ; R477.1@476.293,239.931 R477.1@476.293,239.931 v1(477.258,239.932) ; 476.881,239.939 R478.1@478.105,239.939
  L14 (Sign) w0.254: v1(474.17,239.925) 477.252,239.925 v1(477.258,239.932)
NetR479_1: R479.1 R480.1 U35_I2C_Expander3.11 | length 6.4
  L1 w0.254: 472.72,240.57 473.095,240.57 474.295,241.77 475.879,241.77 476.293,241.356 R479.1@476.293,240.976 ; R479.1@476.293,240.983 R480.1@478.105,240.983
NetR481_2: R481.2 U26_SPI_bridge3.13
NetR488_1: R488.1 T36.3 U32.2
NetR543_1: R543.1 X9.3
NetR544_1: R544.1 X9.1
NetR558_I2C_Bridge_2_1: R558_I2C_Bridge_2.1 U3_I2C_Bridge_2.3 U35_I2C_Expander_14.9 U35_I2C_Expander_15.9 U35_I2C_Expander_16.9
NetR561_2: R561.2 R562.2 R563.2 R564.2 U64_U_Pomiar_pradu_napiecia_3.2 | length 7
  L1 w0.254: v8(200.098,145.284) 200.098,145.266 200.296,145.068 U64_U_Pomiar_pradu_napiecia_3.2@200.296,144.262
  L16 w0.254: R561.2@198.011,149.079 198.011,148.149 198.011,147.2 198.112,147.098 198.112,146.722 198.361,146.474 198.909,146.474 v8(200.098,145.284) ; R561.2@198.019,149.246 R562.2@198.019,150.181
NetR565_2: R565.2 R566.2 R567.2 R568.2 U64_U_Pomiar_pradu_napiecia_3.1 | length 6.5
  L1 w0.254: U64_U_Pomiar_pradu_napiecia_3.1@200.796,144.262 200.796,145.078 200.997,145.279 v8(200.997,145.294)
  L16 w0.254: v8(200.997,145.294) 201.861,146.157 R568.2@201.861,147.2 ; R568.2@201.861,147.2 201.861,149.646 R566.2@201.861,150.265 R566.2@201.911,150.265
NetR569_2: R569.2 R570.2 R571.2 R572.2 U64_U_Pomiar_pradu_napiecia_4.2 | length 6.9
  L1 w0.254: v8(267.324,178.992) 267.324,178.952 267.482,178.794 267.482,178.042 U64_U_Pomiar_pradu_napiecia_4.2@267.505,178.019
  L16 w0.254: R570.2@265.405,183.751 R569.2@265.405,182.786 R571.2@265.405,181.846 R572.2@265.405,180.907 265.405,180.391 265.633,180.162 266.153,180.162 v8(267.324,178.992)
NetR573_2: R573.2 R574.2 R575.2 R576.2 U64_U_Pomiar_pradu_napiecia_4.1 | length 6.2
  L1 w0.254: U64_U_Pomiar_pradu_napiecia_4.1@268.005,178.019 268.028,178.042 268.028,178.802 268.155,178.929 v8(268.155,178.969)
  L16 w0.254: v8(268.155,178.969) 269.055,179.869 R576.2@269.055,180.907 R575.2@269.055,181.846 R573.2@269.055,182.786 R574.2@269.055,183.751
NetR577_2: R577.2 R578.2 R579.2 R580.2 U64_U_Pomiar_pradu_napiecia_5.2 | length 7.2
  L1 w0.164: v8(220.143,136.12) 220.143,136.057 220.253,135.947 U64_U_Pomiar_pradu_napiecia_5.2@220.253,135.17
  L16 w0.164: R578.2@218.402,141.279 R577.2@218.402,140.072 R579.2@218.402,138.865 R580.2@218.402,137.658 218.402,137.258 219.54,136.12 v8(220.143,136.12)
NetR581_2: R581.2 R582.2 R583.2 R584.2 U64_U_Pomiar_pradu_napiecia_5.1 | length 6.7
  L1 w0.164: U64_U_Pomiar_pradu_napiecia_5.1@220.753,135.17 220.753,135.915 220.909,136.071 v8(220.909,136.12)
  L16 w0.164: v8(220.909,136.12) 222.097,137.308 R584.2@222.097,137.658 222.097,138.854 R583.2@222.108,138.865 R582.2@222.108,141.279
NetR585_2: R585.2 R586.2 R587.2 R588.2 U64_U_Pomiar_pradu_napiecia_6.2 | length 6.7
  L1 w0.254: v8(223.83,126.055) 223.87,126.055 223.997,126.182 224.757,126.182 U64_U_Pomiar_pradu_napiecia_6.2@224.78,126.205
  L16 w0.254: R586.2@218.851,124.405 R588.2@221.959,124.405 ; R588.2@221.959,124.405 221.959,124.455 222.132,124.628 222.403,124.628 v8(223.83,126.055)
NetR589_2: R589.2 R590.2 R591.2 R592.2 U64_U_Pomiar_pradu_napiecia_6.1 | length 6.4
  L1 w0.254: v8(223.83,126.855) 223.87,126.855 223.997,126.728 224.757,126.728 U64_U_Pomiar_pradu_napiecia_6.1@224.78,126.705
  L16 w0.254: R590.2@218.861,127.778 218.864,127.78 221.956,127.78 R592.2@221.959,127.783 222.902,127.783 v8(223.83,126.855)
NetR595_2: R595.2 R596.2 R597.2 R598.2 U64_U_Pomiar_pradu_napiecia_2.1 | length 6.2
  L1 w0.254: U64_U_Pomiar_pradu_napiecia_2.1@54.676,41.783 55.614,41.783 55.815,41.582 v8(55.854,41.582)
  L16 w0.254: v8(55.854,41.582) 56.437,41 R598.2@57.264,41 R596.2@60.53,41
NetR599_1: R599.1 U3_I2C_Bridge_2.19 U35_I2C_Expander?.8 U36_U_Translator_I2C1.6 U36_U_Translator_I2C2.6
  other v1: 469.895,195.896 470.995,195.896 472.095,195.896 473.195,195.896 469.895,196.996 470.995,196.996 472.095,196.996 473.195,196.996 469.895,198.096 470.995,198.096 472.095,198.096 473.195,198.096 469.895,199.196 470.995,199.196 472.095,199.196 473.195,199.196
NetR600_1: R600.1 R601.2 U58.1
NetR607_1: R607.1 U1.AA13
NetR612_1: R612.1 U34.29 | length 8.5
  L1 w0.254: v1(119.019,42.916) 120.397,42.916 120.406,42.906 U34.29@120.477,42.906
  L16 w0.254: v1(116.226,38.001) 117.002,38.001 117.37,38.369 117.37,39 117.938,39.568 117.938,42.767 118.087,42.916 v1(119.019,42.916)
NetR614_1: R614.1 U34.12 | length 6.9
  L1 w0.254: U34.12@124.977,42.906 124.979,42.904 125.128,42.904 125.132,42.899 126.234,42.899 126.383,42.75 126.383,42.194 127.404,41.172 R614.1@127.404,37.776
NetR621_1: R621.1 U37.29 | length 15.1
  L1 w0.254: R621.1@201.912,52.737 202.559,52.737 202.566,52.729 v11(202.566,52.538) ; v11(210.566,42.366) 210.573,42.359 U37.29@211.295,42.359
  L3 (Sign) w0.254: v11(202.566,52.538) 207.267,47.837 207.267,45.666 v11(210.566,42.366)
NetR622_1: R622.1 U37.12 | length 14.5
  L1 w0.254: U37.12@215.795,42.359 216.124,42.359 v11(216.145,42.339) ; v11(224.342,52.437) R622.1@224.947,52.437
  L3 (Sign) w0.254: v11(216.145,42.339) 219.422,45.617 219.422,47.517 v11(224.342,52.437)
NetR628_1: R628.1 U38.12 | length 16
  L1 w0.254: U38.12@168.283,38.515 v11@168.893,38.515 ; v30(176.297,50.245) R628.1@176.922,50.245
  L3 (Sign) w0.254: v11(168.894,38.516) 174.934,44.556 174.934,48.882 v30(176.297,50.245)
NetR644_1: R644.1 R645.2 U69.9 | length 2.4
  L1 w0.254: R644.1@158.898,150.312 R645.2@158.898,151.5 158.938,151.46 160.02,151.46 U69.9@160.043,151.437
NetR648_2: R648.2 T25.3
NetR650_2: R650.2 T23.1 T24.3
NetR651_1: R651.1 T27.1 T28.3
NetR653_2: R653.2 T30.3
NetR655_1: R655.1 T29.1
NetR657_2: R657.2 T31.3
NetR658_1: R658.1 T31.1
NetR665_2: R665.2 U65.13 | length 6
  L1 w0.254: U65.13@54.172,81.207 55.223,81.207 55.938,80.491 55.938,78.6 56.654,77.884 R665.2@57.678,77.884
NetR677_1: R677.1 R682.2 U48.6 | length 2.1
  L1 w0.254: R677.1@67.235,35.022 R682.2@67.235,34.081 67.235,33.09 67.267,33.058 U48.6@67.267,32.912
NetR678_1: R678.1 R683.2 U48.5 | length 4.3
  L1 w0.254: R683.2@67.235,36.958 67.235,36.022 67.812,35.445 67.812,33.103 67.767,33.058 U48.5@67.767,32.912
NetR679_1: R679.1 R684.2 U48.3 | length 2.2
  L1 w0.254: U48.3@68.767,32.912 68.769,32.914 68.769,33.961 R679.1@68.849,34.041 68.854,34.046 68.854,35.027 R684.2@68.859,35.032
NetR680_1: R680.1 R685.2 U48.4 | length 4.4
  L1 w0.254: U48.4@68.267,32.912 68.267,35.511 68.809,36.052 R680.1@68.859,36.052 68.856,36.055 68.856,37.015 R685.2@68.853,37.017
NetR681_2: R681.2 U48.10 | length 1.4
  L1 w0.254: U48.10@67.767,30.612 67.767,29.657 68.053,29.371 R681.2@68.053,29.321
NetR686_1: R686.1 U38.29 | length 15.8
  L1 w0.254: R686.1@155.653,50.245 v11(156.259,50.245) ; v11(163.221,38.515) U38.29@163.783,38.515
  L3 (Sign) w0.254: v11(156.259,50.245) 157.093,49.411 157.093,44.643 v11(163.221,38.515)
NetR689_2: R689.2 R690.2 U73.7 | length 2.4
  L1 w0.254: U73.7@218.551,210.633 218.651,210.633 218.675,210.657 R689.2@219.964,210.657 R690.2@220.929,210.657
NetR692_1: R692.1 S6.3 S6.4
NetR710_1: R710.1 R711.1 R712.2
NetR711_2: R711.2 U76.4
NetR713_1: R713.1 S7.1 S7.2
NetR714_2: R714.2 S7.3 S7.4
NetR736_1: R736.1 U1.AB13
NetR738_1: R738.1 R739.1 U35_I2C_Expander2.13 | length 7.4
  L1 w0.254: 490.04,229.565 491.33,229.565 492.63,228.265 494.167,228.265 494.517,228.615 R738.1@494.517,229.065 R739.1@496.333,229.065
NetR740_1: R740.1 R741.1 U35_I2C_Expander2.12 | length 7.3
  L1 w0.254: U35_I2C_Expander2.12@490.04,230.215 490.06,230.194 v1(492.106,230.194) ; R740.1@494.517,230.174 494.538,230.194 v1(495.467,230.194) 495.477,230.184 496.323,230.184 R741.1@496.333,230.174
  L14 (Sign) w0.254: v1(492.106,230.194) v1(495.467,230.194)
NetR742_1: R742.1 R743.1 U35_I2C_Expander2.11 | length 7.4
  L1 w0.254: 490.04,230.865 491.495,230.865 492.63,232.001 494.167,232.001 494.492,231.676 494.492,231.224 R742.1@494.517,231.199 R743.1@496.333,231.199
NetR753_1: R753.1 U3_I2C_Bridge.24 U35_I2C_Expander?.4
NetR754_1: R754.1 U35_I2C_Expander2.14 U35_I2C_Expander?.23
NetR758_1: R758.1 R759.1 U35_I2C_Expander?.13 | length 7.2
  L1 w0.254: 474.42,197.546 475.195,197.546 476.495,196.246 478.008,196.246 478.213,196.451 R758.1@478.213,197.199 479.404,197.199 479.414,197.189 R759.1@480.204,197.189
NetR760_1: R760.1 R761.1 U35_I2C_Expander?.12 | length 6.9
  L1 w0.254: U35_I2C_Expander?.12@474.42,198.196 474.43,198.206 v1(475.947,198.206) ; R760.1@478.214,198.206 v1(479.292,198.206) 479.297,198.201 480.2,198.201 R761.1@480.204,198.196
  L14 (Sign) w0.254: v1(475.947,198.206) v1(479.292,198.206)
NetR762_1: R762.1 R763.1 U35_I2C_Expander?.11 | length 7
  L1 w0.254: 474.42,198.846 475.15,198.846 476.35,200.046 478.008,200.046 478.214,199.84 R762.1@478.214,199.196 479.404,199.196 479.414,199.187 R763.1@480.204,199.187
NetR765_1: R765.1 U1.AE14
NetR766_1: R766.1 U1.AE13
NetR766_2: R766.2
NetR767_1: R767.1 U1.AC14
NetR767_2: R767.2
NetR768_1: R768.1
NetR769_1: R769.1
NetR770_1: R770.1
NetR771_1: R771.1
NetR836_2: R836.2 R838.1 U35_I2C_Expander_16.22
NetR837_2: R837.2 R840.1 U35_I2C_Expander_16.19
NetR839_2: R839.2 R841.1 U35_I2C_Expander_16.17
NetT22_3: T22.3 T23.2
NetT34_4: T34.4 U65.11 | length 16.6
  L1 w0.254: U65.11@54.172,80.207 55.023,80.207 v9(55.025,80.204)
  L16 w0.254: v9(55.025,80.204) 62.577,87.757 v9(67.63,87.757)
NetT35_4: T35.4 U65.15 | length 9.8
  L1 w0.254: U65.15@54.172,82.207 v11(54.875,82.207) ; v11(61.493,78.15) T35.4@62.331,78.15
  L3 (Sign) w0.254: v11(54.875,82.207) 58.931,78.15 v11(61.493,78.15)
NetTP7_I2C_Bridge_2_1: U3_I2C_Bridge_2.24 U35_I2C_Expander?.26
NetU1_AJ1: U1.AJ1
NetU1_AJ2: U1.AJ2
NetU1_D9: U1.D9
NetU1_D10: U1.D10
NetU3_I2C_Bridge_3_19: U3_I2C_Bridge_3.19 U36_U_Translator_I2C3.6 U36_U_Translator_I2C4.6
NetU3_I2C_Bridge_3_20: U3_I2C_Bridge_3.20 U36_U_Translator_I2C3.5 U36_U_Translator_I2C4.5
NetU24_SPI_bridge1_3: U24_SPI_bridge1.3 U25_SPI_bridge1.3 U25_SPI_bridge3.14 U26_SPI_bridge1.3 U27_SPI_bridge1.3 U28_SPI_bridge1.3
NetU24_SPI_bridge1_4: U24_SPI_bridge1.4 U25_SPI_bridge1.4 U25_SPI_bridge3.13 U26_SPI_bridge1.4 U27_SPI_bridge1.4 U28_SPI_bridge1.4
NetU24_SPI_bridge1_5: U24_SPI_bridge1.5 U25_SPI_bridge1.5 U25_SPI_bridge3.12 U26_SPI_bridge1.5 U27_SPI_bridge1.5 U28_SPI_bridge1.5
NetU24_SPI_bridge3_12: U24_SPI_bridge3.12
NetU24_SPI_bridge3_13: U24_SPI_bridge3.13
NetU24_SPI_bridge3_14: U24_SPI_bridge3.14
NetU27_SPI_bridge2_12: U27_SPI_bridge2.12
NetU27_SPI_bridge2_13: U27_SPI_bridge2.13
NetU27_SPI_bridge2_14: U27_SPI_bridge2.14
NetU27_SPI_bridge3_12: U27_SPI_bridge3.12
NetU27_SPI_bridge3_13: U27_SPI_bridge3.13
NetU27_SPI_bridge3_14: U27_SPI_bridge3.14
NetU28_SPI_bridge3_12: U28_SPI_bridge3.12
NetU28_SPI_bridge3_13: U28_SPI_bridge3.13
NetU28_SPI_bridge3_14: U28_SPI_bridge3.14
NetU35_I2C_Expander1_1: U35_I2C_Expander1.1
NetU35_I2C_Expander1_25: U35_I2C_Expander1.25
NetU35_I2C_Expander1_26: U35_I2C_Expander1.26
NetU35_I2C_Expander1_27: U35_I2C_Expander1.27
NetU35_I2C_Expander1_28: U35_I2C_Expander1.28
NetU35_I2C_Expander2_15: U35_I2C_Expander2.15
NetU35_I2C_Expander2_16: U35_I2C_Expander2.16
NetU35_I2C_Expander2_25: U35_I2C_Expander2.25
NetU35_I2C_Expander2_26: U35_I2C_Expander2.26
NetU35_I2C_Expander2_27: U35_I2C_Expander2.27
NetU35_I2C_Expander3_20: U35_I2C_Expander3.20
NetU35_I2C_Expander3_22: U35_I2C_Expander3.22
NetU35_I2C_Expander3_23: U35_I2C_Expander3.23
NetU35_I2C_Expander3_25: U35_I2C_Expander3.25
NetU35_I2C_Expander?_17: U35_I2C_Expander?.17
NetU35_I2C_Expander?_27: U35_I2C_Expander?.27
NetU35_I2C_Expander_10_27: U35_I2C_Expander_10.27
NetU35_I2C_Expander_12_26: U35_I2C_Expander_12.26
NetU35_I2C_Expander_12_27: U35_I2C_Expander_12.27
NetU35_I2C_Expander_13_2: U35_I2C_Expander_13.2
NetU35_I2C_Expander_13_17: U35_I2C_Expander_13.17
NetU35_I2C_Expander_13_18: U35_I2C_Expander_13.18
NetU35_I2C_Expander_13_20: U35_I2C_Expander_13.20
NetU35_I2C_Expander_13_26: U35_I2C_Expander_13.26
NetU35_I2C_Expander_13_27: U35_I2C_Expander_13.27
NetU35_I2C_Expander_14_17: U35_I2C_Expander_14.17
NetU35_I2C_Expander_14_25: U35_I2C_Expander_14.25
NetU35_I2C_Expander_14_26: U35_I2C_Expander_14.26
NetU35_I2C_Expander_15_4: U35_I2C_Expander_15.4
NetU35_I2C_Expander_15_17: U35_I2C_Expander_15.17
NetU35_I2C_Expander_15_23: U35_I2C_Expander_15.23
NetU35_I2C_Expander_15_24: U35_I2C_Expander_15.24
NetU35_I2C_Expander_16_1: U35_I2C_Expander_16.1
NetU35_I2C_Expander_16_4: U35_I2C_Expander_16.4
NetU35_I2C_Expander_16_23: U35_I2C_Expander_16.23
NetU35_I2C_Expander_16_24: U35_I2C_Expander_16.24
NetU35_I2C_Expander_16_25: U35_I2C_Expander_16.25
NetU35_I2C_Expander_16_26: U35_I2C_Expander_16.26
NetU35_I2C_Expander_16_27: U35_I2C_Expander_16.27
NetU35_I2C_Expander_16_28: U35_I2C_Expander_16.28
NetU36_U_Translator_I2C1_8: U36_U_Translator_I2C1.8
NetU36_U_Translator_I2C4_8: U36_U_Translator_I2C4.8
NVME_C_RX_1_N: C718.1 U1.K28
NVME_C_RX_1_P: C717.1 U1.K27
NVME_C_RX_O_N: C677.1 U1.M28
NVME_C_RX_O_P: C653.1 U1.M27
NVME_C_TX_1_N: C716.1 U1.J30
NVME_C_TX_1_P: C715.1 U1.J29
NVME_C_TX_O_N: C651.1 U1.L30
NVME_C_TX_O_P: C649.1 U1.L29
NVMe_Rx_0_N: C677.2 J27.47 R541.1
NVMe_Rx_0_P: C653.2 J27.49 R541.2
NVMe_Rx_1_N: C718.2 J27.35 R542.1
NVMe_Rx_1_P: C717.2 J27.37 R542.2
NVMe_Tx_0_N: C651.2 J27.41
NVMe_Tx_0_P: C649.2 J27.43
NVMe_Tx_1_N: C716.2 J27.29
NVMe_Tx_1_P: C715.2 J27.31
OSC_500Out: C333.2 X2.10 | length 3.2
  L3 (Sign) w0.254: v25(419.252,351.917) v26(422.427,351.917)
  other v25: 422.427,351.917
  other v26: 419.252,351.917
Osc_in_Si53323_2_N: C343.2 R259.2 R261.2 R489.1 U32.6
Osc_in_Si53323_2_P: C342.2 R260.2 R262.2 R489.2 U32.7
OSC_Out_DIV_N: C343.1 R258.1 U33.11
OSC_Out_DIV_P: C342.1 R256.2 U33.10
PCIE0_CLK_N: J1_PCIE0.53
PCIE0_CLK_P: J1_PCIE0.55
PCIE0_En_DCDC: J1_PCIE0.36 U35_I2C_Expander_11.22
PCIE0_Prsnt1: J1_PCIE0.12 U35_I2C_Expander_12.28
PCIE0_Prsnt2: U35_I2C_Expander_12.25
PCIE0_Reset: J1_PCIE0.32 U35_I2C_Expander_11.19
PCIE0_SysRef_FPGA_N: U1.AG10
PCIE0_SysRef_FPGA_P: U1.AF10
PCIE0_SysRef_N: J1_PCIE0.52
PCIE0_SysRef_P: J1_PCIE0.50
PCIE1_CLK_N: 
PCIE1_CLK_P: 
PCIE1_En_DCDC: U35_I2C_Expander_11.23
PCIE1_Prsnt1: U35_I2C_Expander_11.1
PCIE1_Prsnt2: U35_I2C_Expander_11.17
PCIE1_Reset: U35_I2C_Expander_11.24
  other v1: 486.479,207.811 487.579,207.811 488.679,207.811 489.779,207.811 486.479,208.911 487.579,208.911 488.679,208.911 489.779,208.911 486.479,210.011 487.579,210.011 488.679,210.011 489.779,210.011 486.479,211.111 487.579,211.111 488.679,211.111 489.779,211.111
PCIE1_SysRef_FPGA_N: U1.AK8
PCIE1_SysRef_FPGA_P: U1.AK9
PCIE1_SysRef_N: 
PCIE1_SysRef_P: 
PCIE2_CLK_N: J1_PCIE2.53 U14.6
PCIE2_CLK_P: J1_PCIE2.55 U14.7
PCIE2_En_DCDC: J1_PCIE2.36 U35_I2C_Expander_11.25
PCIE2_Prsnt1: J1_PCIE2.12 U35_I2C_Expander_11.27
PCIE2_Prsnt2: U35_I2C_Expander_12.21
PCIE2_Reset: J1_PCIE2.32 U35_I2C_Expander_11.26
PCIE2_SysRef_FPGA_N: U1.AJ9 U14.30
PCIE2_SysRef_FPGA_P: U1.AH9 U14.31
PCIE2_SysRef_N: J1_PCIE2.52 U14.3
PCIE2_SysRef_P: J1_PCIE2.50 U14.4
PCIE3_CLK_N: U14.15
PCIE3_CLK_P: U14.16
PCIE3_En_DCDC: U35_I2C_Expander_12.2
PCIE3_Prsnt1: U35_I2C_Expander_12.3
PCIE3_Prsnt2: U35_I2C_Expander_12.22
PCIE3_Reset: U35_I2C_Expander_12.18
PCIE3_SysRef_FPGA_N: U1.AF7 U14.27
PCIE3_SysRef_FPGA_P: U1.AF8 U14.28
PCIE3_SysRef_N: U14.9
PCIE3_SysRef_P: U14.10
PCIE4_CLK_N: J1_PCIE4.53 U14.21
PCIE4_CLK_P: J1_PCIE4.55 U14.22
PCIE4_En_DCDC: J1_PCIE4.36 U35_I2C_Expander_12.17
PCIE4_Prsnt1: J1_PCIE4.12 U35_I2C_Expander_12.23
PCIE4_Prsnt2: U35_I2C_Expander_12.24
PCIE4_Reset: J1_PCIE4.32 U35_I2C_Expander_12.4
PCIE4_SysRef_FPGA_N: U1.AE8 U14.24
PCIE4_SysRef_FPGA_P: U1.AE9 U14.25
PCIE4_SysRef_N: J1_PCIE4.52 U14.18
PCIE4_SysRef_P: J1_PCIE4.50 U14.19
PCIe_Reset: R788.1
PDN: R498.2 U16.46
PDN_LMK05028: R499.1 U35_I2C_Expander_14.27
PEDET: J27.61
PERST#: J27.50
PEwake: J27.54
PG1_1: R295.2 R836.1 R839.1 U37.27 | length 1.4
  L1 w0.254: R295.2@209.891,43.359 U37.27@211.295,43.359
PG1_2: R313.2 U38.27 | length 1.8
  L1 w0.254: R313.2@162.193,40.015 162.721,40.015 163.221,39.515 U38.27@163.783,39.515
PG1_TPS7A8801: R440.1 U35_I2C_Expander2.1 U61.17 | length 4.6
  L1 w0.254: R440.1@230.82,137.821 230.87,137.771 v11(231.07,137.771) ; v11(233.692,137.138) U61.17@233.692,138.03
  L3 (Sign) w0.254: v11(231.07,137.771) 232.225,136.616 233.407,136.616 233.692,136.901 v11(233.692,137.138)
PG2_2: R314.2 R837.1 U38.14 | length 1.6
  L1 w0.254: U38.14@168.283,39.515 168.285,39.517 169.606,39.517 R314.2@169.774,39.685
PG2_TPS7A8801: R441.1 U35_I2C_Expander2.28 U61.9 | length 4.7
  L1 w0.254: U61.9@233.692,141.98 v11(233.692,142.578)
  L3 (Sign) w0.254: v11(229.707,142.827) 233.442,142.827 v11(233.692,142.578)
PG2_TPS7A8801_0V9: R676.1 U37.8 U70.9 U73.5 | length 3
  L1 w0.254: U70.9@298.759,169.748 298.759,168.033 299.431,167.361 299.431,167.311 299.604,167.138 R676.1@299.654,167.138
PG_1V0@1.5A: R834.2 U35_I2C_Expander_16.20 U51.5 | length 4.4
  L1 w0.254: U51.5@185.559,121.563 U51.5@185.684,121.563 ; v8(189.244,122.7) 189.244,123.125
  L16 w0.254: v8(185.859,121.563) 188.108,121.563 v8(189.244,122.7)
PG_1V8@1.5A: R833.2 U35_I2C_Expander_16.21 U50.5 | length 4.3
  L1 w0.254: U50.5@185.559,126.81 185.589,126.81 U50.5@185.637,126.762 ; v8(189.244,127.829) 189.244,128.254
  L16 w0.254: v8(185.859,126.81) 188.226,126.81 v8(189.244,127.829)
PG_2V5@1.5A: R392.1 U18.A2 U49.5 | length 4.4
  L1 w0.254: v8(189.711,132.07) R392.1@189.711,132.495
  L16 w0.254: v8(185.859,131.659) 186.269,132.07 v8(189.711,132.07)
PG_48_20V: R835.2 U35_I2C_Expander_16.18 U65.19 | length 6.6
  L1 w0.254: U65.19@51.832,83.047 v9(51.832,83.914)
  L16 w0.254: v9(47.095,81.529) 49.447,81.529 v9(51.832,83.914)
PG_DCDC_Low_curr: R832.2 U19.23 U35_I2C_Expander_16.3
PG_LT3042: R442.1 U62.4 | length 1.2
  L1 w0.254: R442.1@419.739,341.217 420.559,341.217 420.684,341.342 U62.4@420.905,341.342
PG_PS_LN_5V0_1: U35_I2C_Expander2.4
PG_PS_LTC6952_1: R431_U_5V_to_3V33.1 U35_I2C_Expander2.21 U59_U_5V_to_3V33.5 | length 2.1
  L1 w0.254: U59_U_5V_to_3V33.5@292.231,67.334 292.25,67.334 292.298,67.286 292.298,66.858 292.553,66.603 R431_U_5V_to_3V33.1@293.804,66.603
PG_PS_LTC6952_2: R431_U_5V_to_3V32.1 U35_I2C_Expander2.3 U59_U_5V_to_3V32.5 | length 4
  L1 w0.254: R431_U_5V_to_3V32.1@278.329,63.034 v11(278.329,63.459) ; v11(280.919,64.483) 280.945,64.509 U59_U_5V_to_3V32.5@281.454,64.509
  L3 (Sign) w0.254: v11(278.329,63.459) 279.353,64.483 v11(280.919,64.483)
PG_PS_LTC6952_3: R431_U_5V_to_3V31.1 U35_I2C_Expander2.19 U59_U_5V_to_3V31.5 | length 1.6
  L1 w0.254: R431_U_5V_to_3V31.1@280.259,69.409 280.712,69.409 281.162,68.959 U59_U_5V_to_3V31.5@281.697,68.959
PG_VTT_RAM: R691.2 U35_I2C_Expander_16.2 U73.6 | length 5.8
  L1 w0.254: v8(213.741,208.657) R691.2@213.741,208.783
  L16 w0.254: v8@213.741,208.678 217.346,208.678 v8(218.801,210.133)
PGND: C595.1 C596.1 C597.1 C598.1 C694.1 C695.1 C696.1 C697.1 C698.1 C699.1 C700.1 C704.2 D3.2 D4.2 R324.1 R764.2 T35.1 T35.2 T35.3 U65.16
  other v5: 87.728,76.455 86.59,76.69 77.658,76.765 79.463,76.768 81.218,76.769 83.04,76.769 84.868,76.765 54.875,88.707 53.697,88.717 56.704,88.717 59.628,88.717 58.578,88.769 57.778,89.344 58.578,89.344 59.628,89.344 53.697,89.357 54.875,89.357 55.675,89.357 56.386,89.367 57.146,89.367 54.121,89.98 54.875,89.98 55.655,89.98 56.386,89.98 57.128,89.98 57.787,89.98 58.578,89.98 59.203,89.98
  other v7: 76.5,76.5 87.375,77.25 76.5,78 77.25,78 78,78 78.75,78 79.5,78 80.25,78 81,78 81.75,78 82.5,78 83.25,78 84,78 84.75,78 85.5,78 86.25,78 87,78 76.875,78.75 77.625,78.75 78.375,78.75 79.125,78.75 79.875,78.75 80.625,78.75 81.375,78.75 82.125,78.75 82.875,78.75 83.625,78.75 84.375,78.75 85.125,78.75 85.875,78.75 86.625,78.75
PMU_GPI: J14.7 R784.1
PMU_GPI_1: J14.6 R785.1
PMU_GPI_2: J14.5 R786.1
PMU_GPI_3: J14.4 R787.1
PMU_GPI_5: J14.2 R789.1
PMU_GPO_0: J18.7 R790.1
PMU_GPO_1: J18.6 R791.1
PMU_GPO_2: J18.5 R792.1
PMU_GPO_3: J18.4 R793.1
PMU_GPO_4: J18.3 R794.1
PMU_GPO_5: J18.2 R795.1
Power1_In: P8.1 R448_U_Pomiar_pradu_napiecia_1.1 U64_U_Pomiar_pradu_napiecia_1.10
Power1_In_CM: R12.2 R448_U_Pomiar_pradu_napiecia_1.2 U5.7 U6.C3 U6.D3 U6.D4 U6.E3 U6.E4 U6.F3 U6.F4 U64_U_Pomiar_pradu_napiecia_1.8 U64_U_Pomiar_pradu_napiecia_1.9
  other v12: 67.229,53.795
Power2_In: P10.1 R448_U_Pomiar_pradu_napiecia_2.1 U64_U_Pomiar_pradu_napiecia_2.10
Power2_In_CM: R20.2 R448_U_Pomiar_pradu_napiecia_2.2 U5.2 U7.C3 U7.D3 U7.D4 U7.E3 U7.E4 U7.F3 U7.F4 U64_U_Pomiar_pradu_napiecia_2.8 U64_U_Pomiar_pradu_napiecia_2.9
  other v12: 68.029,53.795
Power4Charging: U6.C2 U6.D1 U6.D2 U6.E1 U6.E2 U6.F1 U6.F2 U7.C2 U7.D1 U7.D2 U7.E1 U7.E2 U7.F1 U7.F2
Power_3.3_1: C99.2 C100.2 C103.2 C104.2 C107.2 C124.2 C141.2 C145.2 C162.2 C179.2 C572.2 C573.2 FB8.1 FB9.1 FB10.1 FB11.1 FB12.1 FB14.1 FB16.1 FB18.1 FB20.1 FB22.1 R436.2 R440.2 U61.14 U61.15
Power_3.3_2: C108.2 C125.2 C142.2 C146.2 C163.2 C576.2 C577.2 FB13.1 FB15.1 FB17.1 FB19.1 FB21.1 R438.2 R441.2 U61.11 U61.12
Power_MUX_Status0: R13.2 U5.9 U35_I2C_Expander1.21 | length 1.2
  L1 w0.254: R13.2@66.879,51.111 U5.9@66.879,52.295
Power_MUX_Status1: R11.2 U4.9 U35_I2C_Expander1.20 | length 1.3
  L1 w0.254: R11.2@67.052,39.6 67.056,39.605 67.056,40.845 U4.9@67.06,40.85
Power_MUX_Status2: R630.2 U35_I2C_Expander1.4 U48.9 | length 1.4
  L1 w0.254: R630.2@67.085,29.321 67.085,30.284 67.267,30.466 U48.9@67.267,30.612
PS_MODE1: P2.3 R350.1 S1.2 U1.R19 U74.2
PS_POR: P3.2 R355.2 U1.N19 U74.1 U76.1 U77.6
PS_Reset: P4.1 R354.1 U1.P20 U77.4 U78.6
PSIO_VOLTAGE_3V3: U57.15
PWR_ExtIO_nReset: R755.1 U35_I2C_Expander1.14 U35_I2C_Expander?.24